# EAGLE board Schema passe-bas (EAGLE 9.4.2)
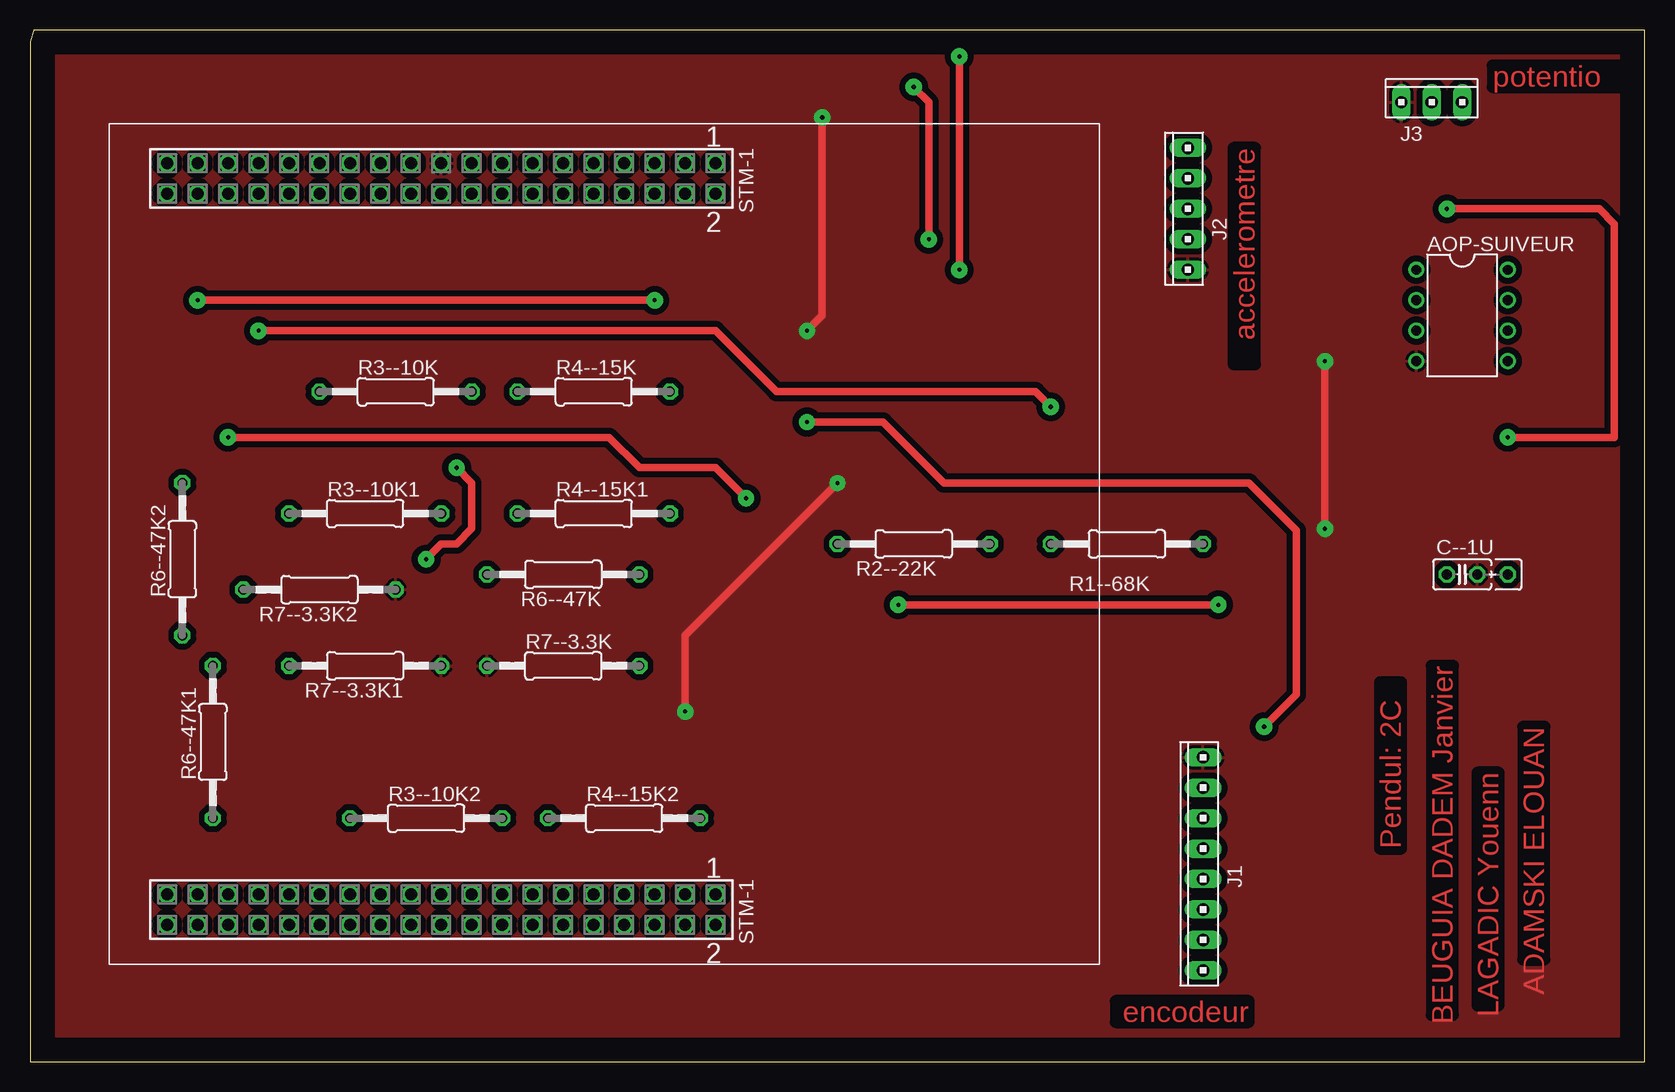
[diagram p0: board, top side]
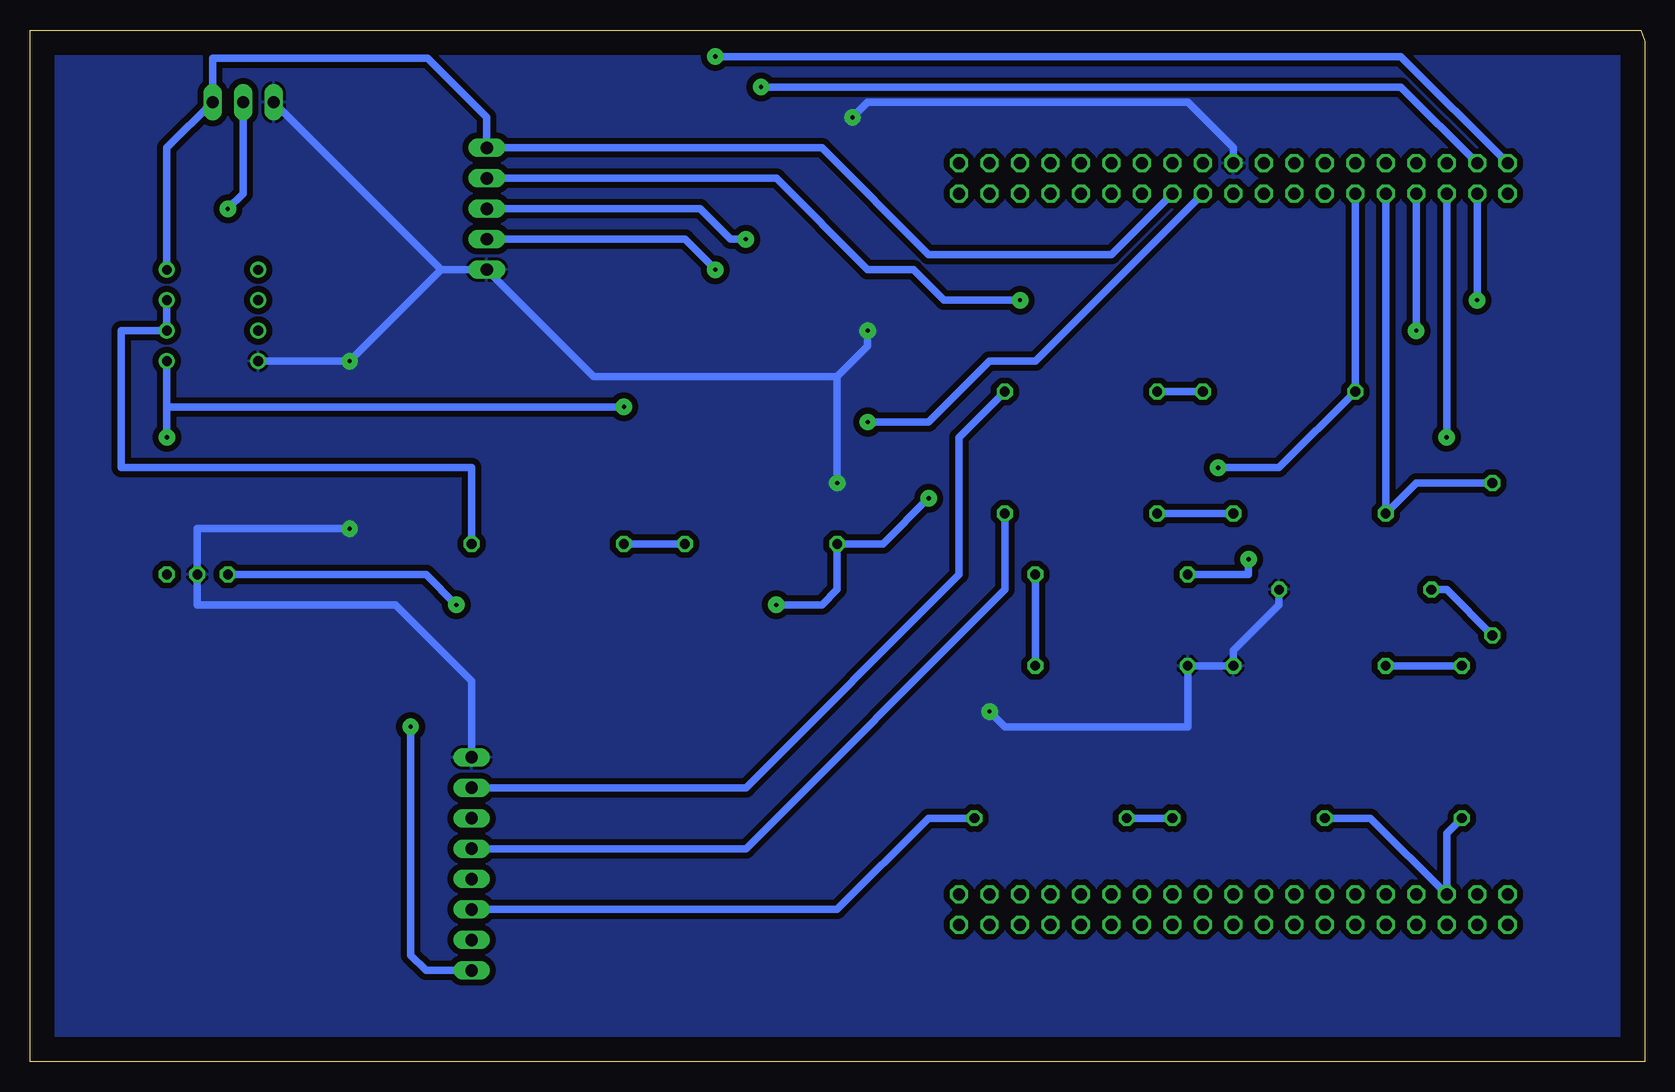
[diagram p1: board, bottom side, seen from below]

Size 134.6 x 86.03 mm. Coordinates in mm from the lower left corner, seen from the top.
Outline: 0,0 134.6,0 134.6,86.03 0.33,86.03 0,85.09 0,0
Copper layers (1*16): Top 0.035mm / dielectric 1.5mm / Bottom 0.035mm
Design rules "LBMS-ENIB": minimum track width 24mil, minimum drill 10mil, track to track 20mil, track to pad 20mil, pad to pad 20mil, via to via 20mil, smd to smd 8mil, copper to edge 80mil, drill to drill 8mil, minimum pad ring 10mil, minimum via ring 20mil, stop-mask expansion 4mil, vias tented up to drill 0mil, thermal gap 10mil
Holes 0.35 mm at 111.76,101.6

## Footprints (pad centres in the part's own frame; a part is rotated, then mirrored left to right if it is on the bottom)
DIL08 = drill 0.813 pad 1.27: 1 -3.81,-3.81; 2 -1.27,-3.81; 3 1.27,-3.81; 4 3.81,-3.81; 5 3.81,3.81; 6 1.27,3.81; 7 -1.27,3.81; 8 -3.81,3.81
C025_050-025X075 = drill 0.813 octagon: 1 -1.27,0; 2 1.27,0; 3 3.81,0
10X08MTA = drill 1.016 long: 1 8.89,0; 2 6.35,0; 3 3.81,0; 4 1.27,0; 5 -1.27,0; 6 -3.81,0; 7 -6.35,0; 8 -8.89,0
10X05MTA = drill 1.016 long: 1 5.08,0; 2 2.54,0; 3 0,0; 4 -2.54,0; 5 -5.08,0
10X03MTA = drill 1.016 long: 1 2.54,0; 2 0,0; 3 -2.54,0
0207/12 = drill 0.813 octagon: 1 -6.35,0; 2 6.35,0
CONN_STM32_NUCLEO = drill 1 pad 1.5 octagon: 1 -1.27,22.86; 2 1.27,22.86; 3 -1.27,20.32; 4 1.27,20.32; 5 -1.27,17.78; 6 1.27,17.78; 7 -1.27,15.24; 8 1.27,15.24; 9 -1.27,12.7; 10 1.27,12.7; 11 -1.27,10.16; 12 1.27,10.16; 13 -1.27,7.62; 14 1.27,7.62; 15 -1.27,5.08; 16 1.27,5.08; 17 -1.27,2.54; 18 1.27,2.54; 19 -1.27,0; 20 1.27,0; 21 -1.27,-2.54; 22 1.27,-2.54; 23 -1.27,-5.08; 24 1.27,-5.08; 25 -1.27,-7.62; 26 1.27,-7.62; 27 -1.27,-10.16; 28 1.27,-10.16; 29 -1.27,-12.7; 30 1.27,-12.7; 31 -1.27,-15.24; 32 1.27,-15.24; 33 -1.27,-17.78; 34 1.27,-17.78; 35 -1.27,-20.32; 36 1.27,-20.32; 37 -1.27,-22.86; 38 1.27,-22.86; 39 59.69,22.86; 40 62.23,22.86; 41 59.69,20.32; 42 62.23,20.32; 43 59.69,17.78; 44 62.23,17.78; 45 59.69,15.24; 46 62.23,15.24; 47 59.69,12.7; 48 62.23,12.7; 49 59.69,10.16; 50 62.23,10.16; 51 59.69,7.62; 52 62.23,7.62; 53 59.69,5.08; 54 62.23,5.08; 55 59.69,2.54; 56 62.23,2.54; 57 59.69,0; 58 62.23,0; 59 59.69,-2.54; 60 62.23,-2.54; 61 59.69,-5.08; 62 62.23,-5.08; 63 59.69,-7.62; 64 62.23,-7.62; 65 59.69,-10.16; 66 62.23,-10.16; 67 59.69,-12.7; 68 62.23,-12.7; 69 59.69,-15.24; 70 62.23,-15.24; 71 59.69,-17.78; 72 62.23,-17.78; 73 59.69,-20.32; 74 62.23,-20.32; 75 59.69,-22.86; 76 62.23,-22.86

## Placement (x,y rotation side)
AOP-SUIVEUR  TL082P  [DIL08]  119.38,62.23 270 top
C--1U  [C025_050-025X075]  119.38,40.64 0 top
J1  [10X08MTA]  97.79,16.51 90 top
J2  [10X05MTA]  96.52,71.12 90 top
J3  [10X03MTA]  116.84,80.01 0 top
R1--68K  [0207/12]  91.44,43.18 180 top
R2--22K  [0207/12]  73.66,43.18 180 top
R3--10K  [0207/12]  30.48,55.88 0 top
R3--10K1  [0207/12]  27.94,45.72 0 top
R3--10K2  [0207/12]  33.02,20.32 0 top
R4--15K  [0207/12]  46.99,55.88 0 top
R4--15K1  [0207/12]  46.99,45.72 0 top
R4--15K2  [0207/12]  49.53,20.32 0 top
R6--47K  [0207/12]  44.45,40.64 180 top
R6--47K1  [0207/12]  15.24,26.67 90 top
R6--47K2  [0207/12]  12.7,41.91 90 top
R7--3.3K  [0207/12]  44.45,33.02 0 top
R7--3.3K1  [0207/12]  27.94,33.02 180 top
R7--3.3K2  [0207/12]  24.13,39.37 180 top
STM-1  NUCLEO-F411RE  [CONN_STM32_NUCLEO]  34.29,73.66 270 top

## Library data of the parts
AOP-SUIVEUR = linear; DATA_SHEET: <a href="http://www.ti.com/lit/ds/symlink/tl084a.pdf"> Data sheet </a>
C--1U = rcl; SPICEPREFIX: C
J1-J3 = con-amp
R1--68K R2--22K R3--10K R3--10K1 R3--10K2 R4--15K R4--15K1 R4--15K2 R6--47K R6--47K1 R6--47K2 R7--3.3K R7--3.3K1 R7--3.3K2 = rcl; SPICEPREFIX: R
STM-1 = prj-ips-jmb

## Nets
GND: AOP-SUIVEUR.4 C--1U.2 J1.1 J2.5 J3.3 R7--3.3K1.1 R7--3.3K2.1 R7--3.3K.1 STM-1.19
N$1: R1--68K.2 R2--22K.1
N$2: AOP-SUIVEUR.6 AOP-SUIVEUR.7 R1--68K.1
N$4: R3--10K2.1 R6--47K1.1 STM-1.71
N$5: AOP-SUIVEUR.5 J3.2 STM-1.32
N$6: R6--47K.1 R7--3.3K.2
N$7: J1.2 R4--15K.2
N$8: R3--10K.2 R4--15K.1
N$9: R6--47K1.2 R7--3.3K1.2
N$10: R3--10K.1 R6--47K.2 STM-1.28
N$11: J1.4 R4--15K1.2
N$12: AOP-SUIVEUR.8 J2.1 J3.1 STM-1.16
N$13: R3--10K1.2 R4--15K1.1
N$14: R6--47K2.1 R7--3.3K2.2
N$15: R3--10K1.1 R6--47K2.2 STM-1.30
N$16: J1.6 R4--15K2.2
N$17: R3--10K2.2 R4--15K2.1
N$19: C--1U.1 R2--22K.2 STM-1.34
N$20: J2.4 STM-1.37
N$21: J2.3 STM-1.35
N$22: J2.2 STM-1.36
VCC: J1.8 STM-1.18

## Tracks (layer width: path | path; a pad name or v marks a point on that pad's centre or on a via)
GND  (via drill 0.35)
  Top 0.61: v67.31,48.26 54.61,35.56 v54.61,29.21 | v107.95,58.42 v107.95,44.45 | v66.04,78.74 66.04,62.23 v64.77,60.96
  Bottom 0.61: STM-1.19 34.29,76.2 38.1,80.01 64.77,80.01 v66.04,78.74 | R7--3.3K2.1 30.48,38.1 34.29,34.29 R7--3.3K1.1 R7--3.3K.1 38.1,27.94 53.34,27.94 v54.61,29.21 | AOP-SUIVEUR.4 v107.95,58.42 100.33,66.04 | v107.95,44.45 120.65,44.45 C--1U.2 120.65,38.1 104.14,38.1 97.79,31.75 J1.1 | 67.31,57.15 64.77,59.69 v64.77,60.96 | v67.31,48.26 67.31,57.15 | 100.33,66.04 J2.5 87.63,57.15 67.31,57.15 | J3.3 100.33,66.04
  pour Bottom: -1.27,87.63 -1.27,-1.27 135.89,-1.27 135.89,87.63
  pour Top: -2.54,88.9 138.43,88.9 138.43,-3.81 -2.54,-3.81
N$1
  Bottom 0.61: R2--22K.1 R1--68K.2
N$2
  Bottom 0.61: AOP-SUIVEUR.7 AOP-SUIVEUR.6 127,60.96 127,49.53 97.79,49.53 R1--68K.1
N$4
  Bottom 0.61: R3--10K2.1 22.86,20.32 STM-1.71 16.51,19.05 R6--47K1.1
N$5  (via drill 0.35)
  Top 0.61: v85.09,54.61 83.82,55.88 62.23,55.88 57.15,60.96 v19.05,60.96 | v118.11,71.12 130.81,71.12 132.08,69.85 132.08,52.07 v123.19,52.07
  Bottom 0.61: 123.19,54.61 AOP-SUIVEUR.5 | STM-1.32 v19.05,60.96 | v85.09,54.61 123.19,54.61 | v123.19,52.07 123.19,54.61 | J3.2 116.84,72.39 v118.11,71.12
N$6
  Bottom 0.61: R6--47K.1 R7--3.3K.2
N$7
  Bottom 0.61: R4--15K.2 57.15,52.07 57.15,40.64 74.93,22.86 J1.2
N$8
  Bottom 0.61: R4--15K.1 R3--10K.2
N$9
  Bottom 0.61: R7--3.3K1.2 R6--47K1.2
N$10  (via drill 0.35)
  Top 0.61: v35.56,49.53 36.83,48.26 36.83,44.45 35.56,43.18 34.29,43.18 v33.02,41.91
  Bottom 0.61: STM-1.28 R3--10K.1 30.48,49.53 v35.56,49.53 | v33.02,41.91 33.02,40.64 R6--47K.2
N$11
  Bottom 0.61: R4--15K1.2 53.34,39.37 74.93,17.78 J1.4
N$12
  Bottom 0.61: STM-1.16 44.45,67.31 59.69,67.31 68.58,76.2 J2.1 96.52,78.74 101.47,83.69 119.38,83.69 J3.1 123.19,76.2 AOP-SUIVEUR.8
N$13
  Bottom 0.61: R3--10K1.2 R4--15K1.1
N$14
  Bottom 0.61: R6--47K2.1 16.51,39.37 R7--3.3K2.2
N$15
  Bottom 0.61: STM-1.30 R3--10K1.1 19.05,48.26 R6--47K2.2
N$16
  Bottom 0.61: R4--15K2.2 59.69,20.32 67.31,12.7 J1.6
N$17
  Bottom 0.61: R3--10K2.2 R4--15K2.1
N$19  (via drill 0.35)
  Top 0.61: v16.51,52.07 48.26,52.07 50.8,49.53 57.15,49.53 v59.69,46.99 | v72.39,38.1 v99.06,38.1
  Bottom 0.61: STM-1.34 v16.51,52.07 | v59.69,46.99 63.5,43.18 R2--22K.2 67.31,39.37 68.58,38.1 v72.39,38.1 | v99.06,38.1 101.6,40.64 C--1U.1
N$20  (via drill 0.35)
  Top 0.61: v77.47,83.82 v77.47,66.04
  Bottom 0.61: STM-1.37 20.32,83.82 v77.47,83.82 | v77.47,66.04 80.01,68.58 J2.4
N$21  (via drill 0.35)
  Top 0.61: v73.66,81.28 74.93,80.01 v74.93,68.58
  Bottom 0.61: STM-1.35 20.32,81.28 v73.66,81.28 | v74.93,68.58 76.2,68.58 78.74,71.12 J2.3
N$22  (via drill 0.35)
  Top 0.61: v13.97,63.5 v52.07,63.5
  Bottom 0.61: STM-1.36 v13.97,63.5 | v52.07,63.5 58.42,63.5 60.96,66.04 64.77,66.04 72.39,73.66 J2.2
VCC  (via drill 0.35)
  Top 0.61: v64.77,53.34 71.12,53.34 76.2,48.26 101.6,48.26 105.55,44.31 105.55,30.62 v102.87,27.94
  Bottom 0.61: STM-1.18 50.8,58.42 54.61,58.42 59.69,53.34 v64.77,53.34 | J1.8 101.6,7.62 102.87,8.89 v102.87,27.94

## Text on the board
Top: potentio | accelerometre | BEUGUIA DADEM Janvier | ADAMSKI ELOUAN | LAGADIC Youenn | Pendul: 2C | encodeur